# Altium PCB Urukul.PcbDoc (part 12 of 15)
Units mm, origin at the board's own origin, x right, y up, seen from the top; angles counter-clockwise.
Board outline 161.99 x 100 mm, 6 copper layers (L1, L2, L3, L4, P5, L6), stack 1.548 mm thick; 1078 components, 609 nets, 3798 pads, 2552 vias.
Unrouted connection lines stored in the file: 1.
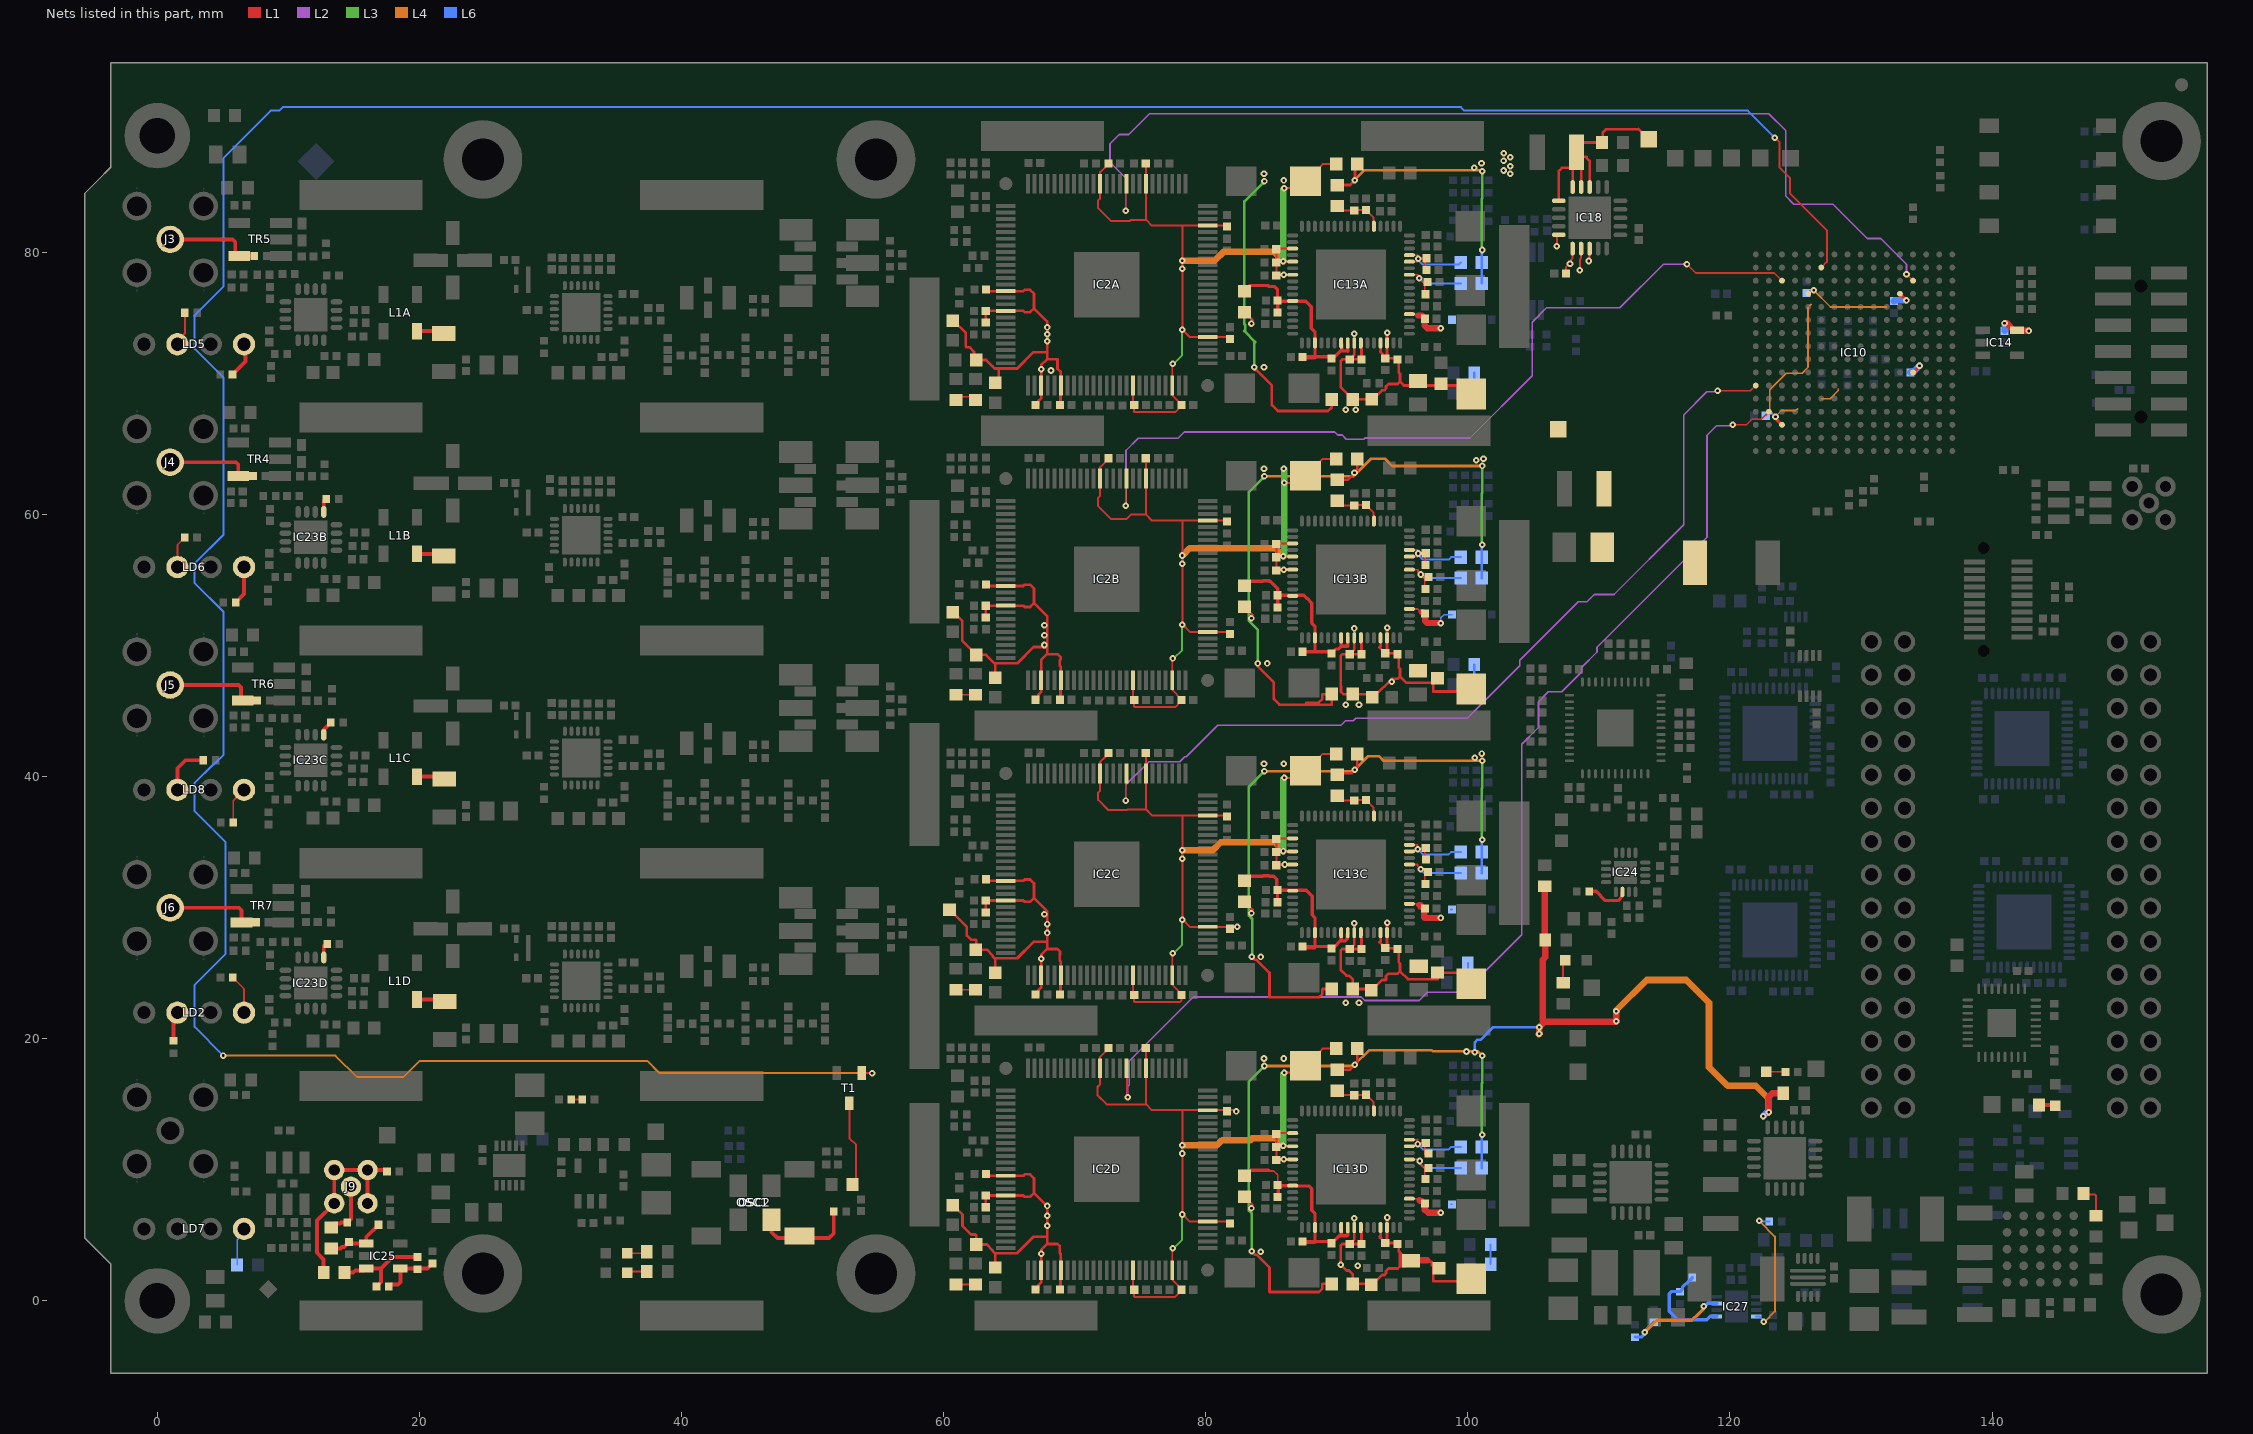
[diagram p14: the nets of this part, all layers, seen from the top]

## Via types
v1: diameter 0.5, hole 0.2, L1 to L6, tented both sides, 1964 vias
v2: diameter 0.5, hole 0.2, L1 to L6, 480 vias
v3: diameter 0.6, hole 0.3, L1 to L6, tented both sides, 52 vias
v4: diameter 0.6, hole 0.3, L1 to L6, 36 vias
v5: diameter 0.762, hole 0.508, L1 to L6, tented both sides, 20 vias

## Nets (pads, with @x,y where several pads share a name; then routed paths per layer and width w, separated by ;. In a path a pad name is that pad's centre, name@x,y a point inside that pad or via, vN(x,y) a via of type N, cw(c..) or ccw(c..) an arc to the next point about the centre after c; other vN are vias at no path point) (continued)
NetIC23B_5: IC23B.5 R138B.2 | length 1
  L1 w0.3: IC23B.5@12.698,60.199 12.698,61.072 R138B.2@12.794,61.168
NetIC23C_5: IC23C.5 R138C.2 | length 1.2
  L1 w0.298: IC23C.5@12.698,43.199 12.713,43.214 12.713,43.582 13.249,44.118 R138C.2@13.249,44.138
NetIC23D_5: IC23D.5 R138D.2 | length 1
  L1 w0.3: IC23D.5@12.698,26.199 12.698,27.072 R138D.2@12.794,27.168
NetIC24_2: IC24.2 R165.2 | length 3.3
  L1 w0.254: R165.2@109.261,31.241 109.798,31.241 110.497,30.542 111.46,30.542 111.793,30.875 IC24.2@111.793,31.196
NetIC25_1: IC25.1 R186.1 R188.2 R189.2 | length 4.7
  L1 w0.298: R186.1@13.269,3.997 13.969,3.997 14.093,4.121 14.236,4.121 14.599,4.483 R189.2@14.619,4.483 14.739,4.363 IC25.1@15.944,4.363 15.944,4.869 R188.2@16.874,5.799
NetIC25_3: IC25.3 R183.2 R184.2 R185.1 | length 7.6
  L1 w0.298: R185.1@14.294,2.153 14.944,2.153 15.114,2.324 15.804,2.324 IC25.3@15.944,2.463 17.069,2.463 ; R184.2@16.724,1.088 17.069,1.433 17.069,2.463 ; R183.2@19.844,3.34 17.946,3.34 17.069,2.463
NetIC25_4: IC25.4 R183.1 R184.1 R187.2 | length 4.7
  L1 w0.298: R184.1@17.664,1.088 17.664,1.108 17.794,1.238 18.356,1.238 18.544,1.426 IC25.4@18.544,2.463 20.614,2.463 R187.2@20.994,2.843
NetIC27_4: IC27.4 R198.2 | length 10.1
  L4 w0.152: v1(122.223,6.099) 123.42,4.902 123.42,-0.805 122.64,-1.585 v1(122.568,-1.585)
  L6 w0.152: IC27.4@121.998,-1.191 122.248,-1.191 122.568,-1.512 v1(122.568,-1.585) ; v1(122.223,6.099) 122.264,6.058 R198.2@123.003,6.058
NetIC27_5: IC27.5 R194.1 R195.2 | length 7.7
  L6 w0.254: R194.1@117.121,1.767 117.121,1.747 116.958,1.584 116.938,1.584 116.377,1.023 116.377,0.866 116.214,0.703 115.522,0.703 115.373,0.554 115.373,-0.815 116.005,-1.448 118.232,-1.448 118.488,-1.191 IC27.5@118.998,-1.191
NetIC27_7: IC27.7 R196.1 R197.2 | length 8.5
  L4 w0.254: v1(113.51,-2.386) 114.399,-1.497 117.103,-1.497 117.645,-0.954 117.967,-0.633 117.967,-0.461 v1(118.014,-0.414)
  L6 w0.254: R196.1@112.756,-2.767 113.248,-2.767 113.463,-2.552 113.463,-2.433 113.557,-2.339 113.557,-2.231 114.167,-1.622 R197.2@114.187,-1.622 ; v1(118.014,-0.414) 118.08,-0.414 118.303,-0.191 IC27.7@118.998,-0.191
NetJ3_1: J3.1 R180.1 TR5.4 | length 7.4
  L1 w0.298: J3.1@0.984,80.988 5.757,80.988 5.945,80.8 5.945,80.033 TR5.4@6.26,79.718 6.272,79.731 R180.1@7.399,79.731
NetJ4_1: J4.1 R179.1 TR4.4 | length 7.3
  L1 w0.298: J4.1@0.984,63.988 6.002,63.988 6.179,63.811 TR4.4@6.179,62.943 R179.1@7.299,62.943
NetJ5_1: J5.1 R181.1 TR6.4 | length 7.7
  L1 w0.298: J5.1@0.984,46.988 6.194,46.988 6.382,46.8 6.382,45.929 TR6.4@6.518,45.793 R181.1@7.638,45.793
NetJ6_1: J6.1 R182.1 TR7.4 | length 7.8
  L1 w0.298: J6.1@0.744,29.988 J6.1@0.984,29.988 6.233,29.988 6.421,29.8 TR7.4@6.421,28.868 7.528,28.868 R182.1@7.541,28.881
NetJ9_1: J9.1 R186.2 R191.1 | length 4.2
  L1 w0.298: R186.2@13.269,5.597 13.559,5.886 13.932,5.886 14.009,5.963 R191.1@14.499,5.963 14.774,6.238 J9.1@14.774,8.708
NetJ9_2: J9.2 R185.2 R190.1 | length 15.2
  L1 w0.298: R185.2@12.694,2.153 12.694,3.163 12.194,3.663 12.194,6.128 J9.2@13.504,7.438 J9.2@13.504,9.978 J9.2@16.044,9.978 ; J9.2@16.044,7.438 J9.2@16.044,9.978 ; R190.1@17.524,9.865 17.411,9.978 J9.2@16.044,9.978
NetL1A_1: L1A.1 R137A.2 | length 1.8
  L1 w0.3: L1A.1@19.814,73.994 21.388,73.994 R137A.2@21.544,73.838
NetL1B_1: L1B.1 R137B.2 | length 1.8
  L1 w0.3: L1B.1@19.814,56.994 21.388,56.994 R137B.2@21.544,56.838
NetL1C_1: L1C.1 R137C.2 | length 1.8
  L1 w0.3: L1C.1@19.814,39.994 21.388,39.994 R137C.2@21.544,39.838
NetL1D_1: L1D.1 R137D.2 | length 1.8
  L1 w0.3: L1D.1@19.814,22.994 21.388,22.994 R137D.2@21.544,22.838
NetL9_2: L9.2 T1.3 | length 6.5
  L1 w0.152: T1.3@52.81,15.075 52.81,12.415 53.318,11.907 53.318,9.162 L9.2@53.044,8.888
NetLD1_2: LD1.2 R5.1 | length 1.4
  L1 w0.152: LD1.2@35.949,2.243 R5.1@37.349,2.243
NetLD2_2: LD2.2 R25.2 | length 2.3
  L1 w0.3: R25.2@1.234,19.833 1.234,21.112 1.266,21.145 1.266,21.72 LD2.2@1.534,21.988
NetLD2_4: LD2.4 R26.2 | length 3
  L1 w0.127: R26.2@5.764,24.663 6.614,23.813 LD2.4@6.614,21.988
NetLD3_2: LD3.2 R33.1 | length 1.5
  L1 w0.127: LD3.2@122.774,17.478 122.782,17.47 R33.1@124.238,17.47
NetLD4_2: LD4.2 R115.1 | length 1.8
  L1 w0.152: R115.1@107.277,24.264 107.277,25.847 LD4.2@107.419,25.988
NetLD5_2: LD5.2 R27.2 | length 2.6
  L1 w0.152: LD5.2@1.534,72.988 1.534,73.246 2.105,73.816 R27.2@2.105,75.388
NetLD5_4: LD5.4 R28.2 | length 1.8
  L1 w0.3: R28.2@5.735,70.688 6.721,71.675 6.721,72.113
NetLD6_2: LD6.2 R29.2 | length 2.5
  L1 w0.127: LD6.2@1.534,55.988 1.534,57.692 R29.2@2.091,58.249
NetLD6_4: LD6.4 R30.2 | length 3
  L1 w0.3: R30.2@5.984,53.288 6.614,53.918 LD6.4@6.614,55.988
NetLD7_4: LD7.4 R143.1 | length 3
  L6 w0.127: R143.1@6.089,2.739 6.089,4.647 6.614,5.172 LD7.4@6.614,5.488
NetLD8_2: LD8.2 R43.2 | length 3.9
  L1 w0.3: LD8.2@1.534,38.988 1.534,40.638 2.145,41.249 R43.2@3.504,41.249
NetLD8_4: LD8.4 R44.2 | length 2.8
  L1 w0.127: R44.2@5.789,36.483 5.789,38.164 LD8.4@6.614,38.988
NetLD9_2: LD9.2 R139.1 | length 1.5
  L1 w0.127: LD9.2@35.869,3.638 37.244,3.638 R139.1@37.349,3.743
NetLD10_2: LD10.2 R116.1 | length 1.3
  L1 w0.152: R116.1@143.578,14.926 R116.1@143.616,14.964
  L1 w0.298: R116.1@143.578,14.926 144.786,14.926 LD10.2@144.832,14.879
NetOSC1_3: OSC1.3 OSC2.3 R117.2 | length 7.7
  L1 w0.298: OSC2.3@46.861,6.188 46.861,5.232 47.313,4.78 51.248,4.78 51.616,5.149 R117.2@51.616,6.812
NetR84_2: R84.2 R87.1 | length 2.6
  L1 w0.152: R84.2@146.982,8.195 147.062,8.116 147.843,8.116 147.932,8.027 R87.1@147.932,6.495
NetR90A_1: R90A.1 R92A.2 | length 1.5
  L1 w0.127: R92A.2@60.944,68.991 R90A.1@62.444,68.991
NetR90B_1: R90B.1 R92B.2 | length 1.5
  L1 w0.127: R92B.2@60.944,46.241 62.394,46.241 62.419,46.266 R90B.1@62.444,46.291
NetR90C_1: R90C.1 R92C.2 | length 1.5
  L1 w0.127: R92C.2@60.944,23.741 R90C.1@62.444,23.741
NetR90D_1: R90D.1 R92D.2 | length 1.3
  L1 w0.127: R92D.2@60.944,1.241 62.144,1.241 R90D.1@62.194,1.291
NetR113A_2: R113A.2 R140A.1 | length 1.5
  L6 w0.203: R113A.2@100.494,69.291 R140A.1@100.494,70.791
NetR113B_2: R113B.2 R140B.1 | length 1.5
  L6 w0.203: R113B.2@100.494,47.041 R140B.1@100.494,48.541
NetR113C_2: R113C.2 R140C.1 | length 1.5
  L6 w0.152: R113C.2@99.994,24.291 R140C.1@99.994,25.791
NetR113D_2: R113D.2 R140D.1 | length 1.5
  L6 w0.152: R113D.2@101.744,2.791 R140D.1@101.744,4.291
NetR133_1: R133.1 R135.2 | length 0.8
  L1 w0.152: R133.1@31.589,15.348 R135.2@32.42,15.348
OSC_ENn: IC10.B6 T1.1 | length 260.5
  L1 w0.152: T1.1@53.76,17.375 53.769,17.366 v1(54.537,17.366) ; v1(123.422,88.753) 123.784,88.39 123.784,86.469 124.565,85.689 124.565,84.516 127.398,81.683 127.398,79.269 IC10.B6@126.97,78.841
  L4 w0.152: v1(5.032,18.714) 13.592,18.714 15.243,17.063 18.774,17.063 20.014,18.304 37.371,18.304 38.281,17.394 54.509,17.394 v1(54.537,17.366)
  L6 w0.152: v1(5.032,18.714) 2.848,20.899 2.848,24.108 5.206,26.466 5.206,35.003 2.848,37.361 2.848,39.519 4.252,40.924 4.318,40.924 5.058,41.664 5.058,52.559 2.848,54.769 2.848,56.263 5.058,58.473 5.058,70.424 2.848,72.633 2.848,75.213 5.058,77.422 5.058,87.218 8.65,90.81 9.317,90.81 9.583,91.077 99.473,91.077 99.74,90.81 121.365,90.81 v1(123.422,88.753)
OSK0: IC2A.60 IC10.C13 | length 78.6
  L1 w0.127: v1(73.9,83.171) 73.9,85.197 IC2A.60@73.944,85.241 ; v1(133.47,78.341) IC10.C13@133.97,77.841
  L2 w0.127: v1(73.9,83.171) 73.9,85.673 72.69,86.883 72.69,88.294 73.394,88.997 74.117,88.997 75.708,90.588 122.963,90.588 124.257,89.294 124.257,84.298 124.878,83.677 127.859,83.677 130.474,81.063 131.512,81.063 133.47,79.105 v1(133.47,78.341)
OSK1: IC2B.60 IC10.C3 | length 65.7
  L1 w0.127: v1(73.9,60.671) 73.9,62.697 IC2B.60@73.944,62.741 ; v1(116.72,79.091) 117.386,78.425 123.386,78.425 IC10.C3@123.97,77.841
  L2 w0.127: v1(73.9,60.671) 73.909,60.68 73.909,64.877 74.85,65.817 77.884,65.817 78.36,66.294 89.837,66.294 90.069,66.062 90.412,66.062 90.723,65.751 92.047,65.751 92.135,65.838 100.162,65.838 104.921,70.597 104.921,74.68 106.008,75.766 111.599,75.766 114.923,79.091 v1(116.72,79.091)
  L3 w0.127: v1(73.9,60.671) v1@73.935,60.705
OSK2: IC2C.60 IC10.L1 | length 69.2
  L1 w0.127: v1(73.9,38.171) 73.9,40.197 IC2C.60@73.944,40.241 ; v1(119.053,69.433) 121.544,69.433 121.952,69.841 IC10.L1@121.97,69.841
  L2 w0.127: v1(73.9,38.171) 73.9,39.372 75.671,41.143 78.023,41.143 78.396,41.516 78.512,41.516 80.924,43.928 90.324,43.928 90.667,44.271 91.263,44.271 91.435,44.443 99.954,44.443 103.965,48.454 103.965,48.87 108.425,53.331 109.093,53.331 109.656,53.893 111.151,53.893 116.472,59.214 116.472,67.594 118.241,69.363 118.983,69.363 v1(119.053,69.433)
  L3 w0.127: v1(73.9,38.171) v1@73.935,38.205
OSK3: IC2D.60 IC10.N2 | length 89.4
  L1 w0.127: IC2D.60@73.944,17.741 73.993,17.692 73.993,15.587 v1(74.042,15.538) ; v1(120.219,66.841) 121.268,66.841 121.684,67.256 122.386,67.256 IC10.N2@122.97,67.841
  L2 w0.127: v1(74.042,15.538) 74.042,16.356 74.154,16.468 74.154,18.296 79.037,23.179 91.876,23.179 92.137,22.919 96.285,22.919 96.912,23.546 99.724,23.546 104.102,27.923 104.102,42.462 105.386,43.746 105.386,45.715 106.136,46.465 107.162,46.465 108.703,48.006 108.703,48.35 109.854,49.502 109.854,49.861 118.25,58.256 118.25,66.054 118.977,66.781 120.158,66.781 v1(120.219,66.841)
  L3 w0.127: v1@73.909,15.68 74.042,15.548 v1(74.042,15.538)
P1V8_AVDDA: C135A.2 C136A.2 C138A.2 C140A.2 IC13A.11 IC13A.19 IC13A.23 IC13A.24 L17A.1 | length 17
  L1 w0.127: C136A.2@85.463,75.407 C136A.2@85.463,75.481 ; C140A.2@85.484,76.338 C140A.2@85.484,76.466 ; C135A.2@87.434,71.888 88.334,71.888
  L1 w0.254: L17A.1@83.134,77.267 83.337,77.47 84.778,77.47 84.853,77.395 85.266,77.395 85.471,77.191 85.471,76.479 85.484,76.466 85.548,76.402 85.674,76.276 86.634,76.276 87.108,76.276 87.117,76.267 87.639,76.267 88.062,75.844 88.062,74.219 88.334,73.947 IC13A.19@88.334,73.091 88.334,72.029 ; C136A.2@85.446,75.463 85.463,75.481 85.484,75.502 C140A.2@85.484,76.338 ; C135A.2@87.394,72.029 88.334,72.029 ; IC13A.23@90.373,73 90.373,72.47 ; IC13A.24@90.834,73.091 90.834,72.453 90.754,72.533 90.754,72.542 90.681,72.47 90.373,72.47 ; 88.334,72.029 89.464,72.029 89.586,71.907 89.594,71.907 89.713,71.907 90.275,72.47 90.373,72.47
P1V8_AVDDB: C135B.2 C136B.2 C138B.2 C140B.2 IC13B.11 IC13B.19 IC13B.23 IC13B.24 L17B.1 | length 18.1
  L1 w0.127: L17B.1@82.956,54.545 83.35,54.939 84.382,54.939 ; C136B.2@85.463,52.907 85.463,53.818 C140B.2@85.484,53.838 ; IC13B.23@90.334,50.241 IC13B.23@90.334,50.591
  L1 w0.254: L17B.1@83.35,54.939 83.394,54.895 84.338,54.895 84.382,54.939 84.385,54.942 84.803,54.942 84.85,54.895 84.937,54.895 85.484,54.348 C140B.2@85.484,53.838 ; C136B.2@85.463,52.907 85.484,52.928 C140B.2@85.484,53.838 ; C135B.2@87.394,49.529 88.334,49.529 ; IC13B.23@90.334,50.241 90.334,49.953 ; IC13B.24@90.834,50.591 90.834,49.953 90.737,49.953 90.703,49.987 90.67,49.953 90.334,49.953 ; C140B.2@85.484,53.838 86.634,53.838 87.079,53.838 87.091,53.827 87.481,53.827 87.718,53.589 87.737,53.589 88.094,53.232 88.094,51.713 88.334,51.473 IC13B.19@88.334,50.591 88.334,49.529 ; 88.334,49.529 89.453,49.529 C138B.2@89.594,49.388 89.939,49.733 90.114,49.733 90.334,49.953
P1V8_AVDDC: C135C.2 C136C.2 C138C.2 C140C.2 IC13C.11 IC13C.19 IC13C.23 IC13C.24 L17C.1 | length 20.3
  L1 w0.127: L17C.1@82.956,32.045 83.35,32.439 84.382,32.439 84.806,32.439 84.828,32.439 84.859,32.409 85.196,32.409 85.484,32.121 C140C.2@85.484,31.356 ; C135C.2@87.434,26.888 88.334,26.888
  L1 w0.254: L17C.1@83.287,32.36 83.322,32.395 84.338,32.395 84.382,32.439 84.385,32.442 84.803,32.442 84.806,32.439 84.85,32.395 85.181,32.395 85.42,32.156 85.42,31.402 C140C.2@85.471,31.351 ; C136C.2@85.446,30.328 85.471,30.353 85.471,30.407 85.471,31.338 C140C.2@85.471,31.351 ; C140C.2@85.484,31.338 C140C.2@85.471,31.351 ; C135C.2@87.394,27.029 88.334,27.029 ; 90.297,27.508 90.297,27.49 90.328,27.459 ; IC13C.23@90.334,28.091 90.334,27.459 ; IC13C.24@90.881,28.067 90.87,28.055 90.805,27.991 90.805,27.61 90.654,27.459 90.334,27.459 ; C140C.2@85.471,31.351 85.471,31.369 85.484,31.356 85.493,31.347 85.522,31.318 86.634,31.318 87.681,31.318 88.138,30.861 88.138,29.439 88.334,29.243 IC13C.19@88.334,28.091 88.334,27.029 ; 88.334,27.029 89.557,27.029 89.56,27.026 89.594,27.026 89.84,27.026 90.273,27.459 90.328,27.459 ; 90.328,27.459 90.334,27.459
P1V8_AVDDD: C135D.2 C136D.2 C138D.2 C140D.2 IC13D.11 IC13D.19 IC13D.23 IC13D.24 L17D.1 | length 17
  L1 w0.127: L17D.1@82.956,9.545 L17D.1@83.35,9.939 ; 84.809,9.939 84.828,9.939 84.859,9.909 85.196,9.909 85.484,9.621 C140D.2@85.484,8.838 ; C140D.2@85.522,8.8 C140D.2@85.531,8.791 ; IC13D.11@86.634,8.791 IC13D.11@86.817,8.791 ; C135D.2@87.434,4.388 88.334,4.388 ; 88.334,4.529 88.334,4.616
  L1 w0.254: L17D.1@83.35,9.939 83.367,9.957 84.792,9.957 84.809,9.939 ; C136D.2@85.522,7.95 C140D.2@85.522,8.8 ; C140D.2@85.573,8.865 85.646,8.791 IC13D.11@86.634,8.791 ; IC13D.11@86.817,8.763 87.859,8.763 88.087,8.534 88.087,6.909 88.334,6.662 IC13D.19@88.334,5.591 88.334,4.616 ; C135D.2@87.394,4.529 88.334,4.529 89.594,4.529 89.771,4.529 90.196,4.953 90.334,4.953 IC13D.23@90.334,5.591 ; 90.334,4.953 90.78,4.953 90.83,5.004 90.83,5.587 IC13D.24@90.834,5.591
P1V8_CLK_VDDA: C30A.1 C44A.1 C72A.1 C99A.1 C107A.1 C112A.1 C115A.1 C116A.2 C117A.2 C118A.2 C119A.2 C120A.2 C127A.2 C128A.2 C133A.2 C134A.2 IC2A.3 IC2A.6 IC2A.89 IC2A.92 IC13A.25 IC13A.26 IC13A.29 IC13A.30 L16A.1 | length 58.5
  L1 w0.203: C72A.1@60.694,74.841 60.719,74.816 61.694,73.841 61.694,72.791 61.715,72.769 61.964,72.769 62.319,72.414 C99A.1@62.319,72.041 ; C99A.1@62.494,71.791 63.244,71.791 63.889,71.146 63.889,71.137 ; C116A.2@63.214,74.638 C118A.2@63.214,75.538 63.217,75.541 IC2A.92@64.744,75.541 66.082,75.541 66.185,75.437 66.603,75.437 66.898,75.732 ; C117A.2@63.244,77.163 63.366,77.041 IC2A.89@64.744,77.041 66.082,77.041 66.185,77.144 66.603,77.144 66.898,76.849 66.898,75.732 ; 63.74,71.286 63.889,71.137 ; C112A.1@64.194,70.091 64.194,71.137 ; C120A.2@67.219,68.316 67.219,68.363 67.219,68.641 67.444,68.866 IC2A.3@67.444,69.841 v1(67.444,71.088) 67.444,71.388 67.894,71.838 ; C119A.2@69.094,68.316 68.958,68.452 68.919,68.491 68.919,69.816 IC2A.6@68.944,69.841 68.944,70.851 68.948,70.855 68.694,71.108 68.694,71.838 67.894,71.838 ; v1(91.334,73.803) IC13A.25@91.334,73.091 91.334,72.188 C134A.2@90.984,71.838 ; IC13A.26@91.834,73.091 91.834,72.741 91.884,72.691 C127A.2@91.884,71.838 C134A.2@90.984,71.838 ; IC13A.29@93.334,72.741 IC13A.29@93.334,73.091 93.344,73.081 93.344,72.741 93.344,72.466 ; 93.344,72.458 93.344,72.466 ; v1(93.853,73.858) 93.834,73.839 IC13A.30@93.834,73.091 C133A.2@93.834,71.913 ; C115A.1@100.264,69.188 100.064,68.988 99.214,69.838 97.944,69.838 96.194,69.838 95.119,69.838 94.819,70.138 ; 63.889,71.137 64.194,71.137 ; 64.194,71.137 65.618,71.137 66.869,72.388 67.894,72.388 ; 66.898,75.732 67.894,74.736 v1(67.894,74.27) 67.894,73.738 v1(67.894,73.228) 67.894,72.388 ; 67.894,71.838 67.894,72.388 ; C134A.2@90.984,71.838 90.419,71.838 90.294,71.713 90.294,69.713 L16A.1@91.219,68.788 92.674,68.788 92.769,68.788 93.455,69.475 93.624,69.475 93.758,69.609 93.758,69.777 93.94,69.96 94.64,69.96 94.819,70.138 ; 93.344,72.466 93.306,72.429 93.694,72.041 C133A.2@93.694,71.913 C133A.2@93.834,71.913 ; C133A.2@93.834,71.913 94.619,71.913 94.656,71.876 94.719,71.813 94.719,70.838 94.819,70.738 94.819,70.138
  L4 w0.203: v1@91.292,73.761 v1(91.334,73.803)
  other v1: 90.694,67.993 91.444,67.993 68.194,70.988 67.894,73.738
P1V8_CLK_VDDB: C30B.1 C44B.1 C72B.1 C99B.1 C107B.1 C112B.1 C115B.1 C116B.2 C117B.2 C118B.2 C119B.2 C120B.2 C127B.2 C128B.2 C133B.2 C134B.2 IC2B.3 IC2B.6 IC2B.89 IC2B.92 IC13B.25 IC13B.26 IC13B.29 IC13B.30 L16B.1 | length 59.5
  L1 w0.203: C72B.1@60.694,52.591 60.719,52.566 61.423,51.862 61.423,50.362 C99B.1@62.494,49.291 63.235,49.291 63.889,48.637 ; C116B.2@63.214,52.138 C118B.2@63.214,53.038 63.217,53.041 IC2B.92@64.744,53.041 66.082,53.041 66.185,52.937 66.603,52.937 66.898,53.232 ; C117B.2@63.244,54.663 63.366,54.541 IC2B.89@64.744,54.541 66.082,54.541 66.185,54.644 66.603,54.644 66.898,54.349 66.898,53.232 ; C112B.1@63.944,47.591 63.944,48.582 63.889,48.637 ; C120B.2@67.219,45.816 67.219,45.863 67.219,46.239 67.444,46.464 IC2B.3@67.444,47.341 67.444,48.888 67.894,49.338 ; C119B.2@69.094,45.816 68.958,45.952 68.919,45.991 68.919,47.316 IC2B.6@68.944,47.341 68.944,48.351 68.948,48.355 68.948,48.373 68.863,48.457 68.863,48.874 68.948,48.958 68.948,49.085 68.694,49.338 67.894,49.338 ; v1(91.334,51.303) IC13B.25@91.334,50.591 91.334,49.688 C134B.2@90.984,49.338 ; IC13B.26@91.834,50.591 91.834,50.241 91.884,50.191 C127B.2@91.884,49.338 C134B.2@90.984,49.338 ; IC13B.29@93.334,50.241 IC13B.29@93.334,50.591 93.344,50.581 93.344,49.966 93.243,49.865 C133B.2@93.694,49.413 C133B.2@93.834,49.413 ; v1(93.853,51.358) 93.834,51.339 IC13B.30@93.834,50.591 C133B.2@93.834,49.413 ; C115B.1@100.264,46.688 100.064,46.488 97.369,46.488 97.369,47.168 95.289,47.168 94.819,47.638 ; 63.889,48.637 65.618,48.637 66.869,49.888 67.694,49.888 67.894,49.888 ; 66.898,53.232 67.894,52.236 67.894,51.541 67.894,50.791 67.894,50.041 67.894,49.888 ; 67.894,49.338 67.894,49.888 ; C134B.2@90.984,49.338 90.419,49.338 90.294,49.213 90.294,46.911 90.323,46.883 90.323,46.466 90.5,46.288 L16B.1@91.219,46.288 92.694,46.288 93.035,46.288 94.09,47.343 94.207,47.46 94.64,47.46 94.819,47.638 ; C133B.2@93.834,49.413 94.619,49.413 94.656,49.376 94.719,49.313 94.719,48.338 94.819,48.238 94.819,47.638
  other v1: 90.694,45.488 91.694,45.488 94.194,47.238 67.694,50.041 67.694,50.791 67.694,51.541
P1V8_CLK_VDDC: C30C.1 C44C.1 C72C.1 C99C.1 C107C.1 C112C.1 C115C.1 C116C.2 C117C.2 C118C.2 C119C.2 C120C.2 C127C.2 C128C.2 C133C.2 C134C.2 IC2C.3 IC2C.6 IC2C.89 IC2C.92 IC13C.25 IC13C.26 IC13C.29 IC13C.30 L16C.1 | length 59.8
  L1 w0.203: C99C.1@60.444,29.841 61.775,28.509 61.775,27.88 62.096,27.56 62.425,27.56 62.494,27.491 C72C.1@62.494,26.791 ; C72C.1@62.194,26.791 C72C.1@62.444,26.791 C72C.1@62.494,26.791 ; C116C.2@63.214,29.638 C118C.2@63.214,30.538 63.217,30.541 IC2C.92@64.744,30.541 66.082,30.541 66.185,30.437 66.603,30.437 66.898,30.732 ; C117C.2@63.244,32.163 63.366,32.041 IC2C.89@64.744,32.041 66.082,32.041 66.185,32.144 66.603,32.144 66.898,31.849 66.898,30.732 ; C112C.1@63.944,25.091 63.944,26.082 63.889,26.137 ; C120C.2@67.219,23.316 67.219,23.363 67.219,23.683 67.444,23.908 IC2C.3@67.444,24.841 v1(67.444,26.088) 67.444,26.388 67.894,26.838 ; C119C.2@69.094,23.316 68.958,23.452 68.919,23.491 68.919,24.816 IC2C.6@68.944,24.841 68.944,25.851 68.948,25.855 68.948,25.868 68.863,25.952 68.863,26.37 68.877,26.383 68.877,26.655 68.694,26.838 67.894,26.838 ; v1(91.334,28.803) IC13C.25@91.334,28.091 91.334,27.188 C134C.2@90.984,26.838 ; IC13C.26@91.834,28.091 91.834,27.741 91.884,27.691 C127C.2@91.884,26.838 C134C.2@90.984,26.838 ; IC13C.29@93.334,27.741 IC13C.29@93.334,28.091 93.344,28.081 93.344,27.466 ; 93.344,27.458 93.344,27.466 ; v1(93.853,28.858) 93.834,28.839 IC13C.30@93.834,28.091 C133C.2@93.834,26.913 ; C115C.1@100.264,24.188 100.381,24.305 99.647,25.039 98.192,25.039 97.949,24.796 97.694,24.541 95.416,24.541 94.819,25.138 ; C72C.1@62.494,26.791 63.291,26.791 63.74,26.342 63.74,26.286 63.889,26.137 ; 63.889,26.137 65.618,26.137 66.869,27.388 67.894,27.388 ; 66.898,30.732 67.894,29.736 67.894,29.488 v1(67.894,28.749) v1(67.894,28.068) 67.894,27.388 ; 67.894,26.838 67.894,27.388 ; C134C.2@90.984,26.838 90.419,26.838 90.294,26.713 90.294,25.261 90.746,24.81 90.923,24.81 91.219,24.513 L16C.1@91.219,23.788 92.644,23.788 92.769,23.788 93.455,24.475 93.758,24.475 93.758,24.777 93.94,24.96 94.64,24.96 94.819,25.138 ; 93.344,27.466 93.243,27.365 C133C.2@93.694,26.913 C133C.2@93.834,26.913 ; C133C.2@93.834,26.913 94.619,26.913 94.656,26.876 94.719,26.813 94.719,25.838 94.819,25.738 94.819,25.138
  other v1: 90.694,22.738 91.694,22.738 67.694,29.488
P1V8_CLK_VDDD: C30D.1 C44D.1 C72D.1 C99D.1 C107D.1 C112D.1 C115D.1 C116D.2 C117D.2 C118D.2 C119D.2 C120D.2 C127D.2 C128D.2 C133D.2 C134D.2 IC2D.3 IC2D.6 IC2D.89 IC2D.92 IC13D.25 IC13D.26 IC13D.29 IC13D.30 L16D.1 | length 61.2
  L1 w0.203: C72D.1@60.694,7.341 60.719,7.316 61.444,6.591 61.444,5.711 62.096,5.06 62.425,5.06 62.494,4.991 C99D.1@62.494,4.291 63.291,4.291 63.74,3.842 63.74,3.786 63.889,3.637 ; C116D.2@63.214,7.138 C118D.2@63.214,8.038 63.217,8.041 IC2D.92@64.744,8.041 66.082,8.041 66.185,7.937 66.603,7.937 66.898,8.232 ; C117D.2@63.244,9.663 63.366,9.541 IC2D.89@64.744,9.541 66.082,9.541 66.185,9.644 66.603,9.644 66.898,9.349 66.898,8.232 ; C112D.1@63.944,2.591 63.944,3.582 63.889,3.637 ; C120D.2@67.219,0.816 67.219,0.863 67.219,1.179 67.444,1.404 IC2D.3@67.444,2.341 v1(67.444,3.588) 67.444,3.888 67.894,4.338 ; C119D.2@69.094,0.816 68.958,0.952 68.919,0.991 68.919,2.316 IC2D.6@68.944,2.341 68.944,3.351 68.948,3.355 68.948,3.567 68.863,3.651 68.863,4.169 68.694,4.338 67.894,4.338 ; v1(91.334,6.303) IC13D.25@91.334,5.591 91.334,4.688 C134D.2@90.984,4.338 ; IC13D.26@91.834,5.591 91.834,5.241 91.884,5.191 C127D.2@91.884,4.338 C134D.2@90.984,4.338 ; IC13D.29@93.334,5.241 IC13D.29@93.334,5.591 93.344,5.581 93.344,4.966 ; 93.37,4.775 93.344,4.802 93.344,4.966 ; v1(93.853,6.358) 93.834,6.339 IC13D.30@93.834,5.591 C133D.2@93.834,4.413 ; 94.81,3.729 94.81,3.689 ; C107D.1@95.694,3.091 95.658,3.055 95.241,2.638 94.974,2.638 94.974,3.054 94.974,3.525 94.81,3.689 ; 96.894,3.091 97.013,2.972 97.229,2.972 97.25,2.951 97.25,2.735 97.369,2.616 97.369,2.497 97.369,1.488 100.064,1.488 C115D.1@100.264,1.688 ; 63.889,3.637 65.618,3.637 66.869,4.888 67.894,4.888 ; 66.898,8.232 v1(67.894,7.236) v1(67.894,6.488) v1(67.894,5.738) 67.894,4.888 ; 67.894,4.338 67.894,4.888 ; C134D.2@90.984,4.338 90.419,4.338 90.294,4.213 v1(90.294,2.761) 90.746,2.31 90.923,2.31 91.219,2.013 L16D.1@91.219,1.288 92.644,1.288 92.769,1.288 93.455,1.975 93.624,1.975 93.758,2.109 93.758,2.277 93.94,2.46 94.64,2.46 94.81,2.629 94.81,3.689 ; 93.344,4.966 93.282,4.904 93.282,4.825 C133D.2@93.694,4.413 C133D.2@93.834,4.413 ; C133D.2@93.834,4.413 94.619,4.413 94.656,4.376 94.719,4.313 94.719,3.78 94.81,3.689
  L1 w0.5: C107D.1@95.694,3.091 96.894,3.091
  other v1: 91.596,2.687
P1V8_DACCLKA: C143A.2 C144A.2 IC13A.44 IC13A.45 L19A.1 | length 6.9
  L1 w0.127: IC13A.44@95.534,79.291 96.171,79.291 96.171,79.484 v1(96.215,79.527) 96.226,79.538 96.784,79.538 96.714,79.468 96.714,78.664 C143A.2@96.714,78.638 ; IC13A.45@95.534,79.791 96.164,79.791
  L1 w0.152: 96.164,79.791 96.215,79.74 v1(96.215,79.527)
  L6 w0.152: v1(96.215,79.527) 96.215,79.41 96.565,79.06 99.286,79.06 L19A.1@99.464,79.238
P1V8_DACCLKB: C143B.2 C144B.2 IC13B.44 IC13B.45 L19B.1 | length 6.9
  L1 w0.127: IC13B.44@95.534,56.791 96.171,56.791 96.171,56.979 v1(96.215,57.023) 96.23,57.038 C144B.2@96.784,57.038 96.714,56.968 96.714,56.158 C143B.2@96.714,56.138 ; IC13B.45@95.534,57.291 96.164,57.291
  L1 w0.152: 96.164,57.291 96.215,57.24 v1(96.215,57.023)
  L6 w0.152: v1(96.215,57.023) 96.215,56.91 96.565,56.56 98.542,56.56 98.72,56.738 L19B.1@99.464,56.738
P1V8_DACCLKC: C143C.2 C144C.2 IC13C.44 IC13C.45 L19C.1 | length 6.9
  L1 w0.127: IC13C.44@95.534,34.291 96.164,34.291 96.171,34.291 96.171,34.453 v1(96.164,34.461) 96.241,34.538 C144C.2@96.784,34.538 96.714,34.468 96.714,33.669 C143C.2@96.714,33.638 ; IC13C.45@95.534,34.791 96.164,34.791
  L1 w0.152: v1(96.164,34.461) 96.164,34.791
  L6 w0.152: v1(96.164,34.461) 96.565,34.06 98.542,34.06 98.72,34.238 L19C.1@99.464,34.238
P1V8_DACCLKD: C143D.2 C144D.2 IC13D.44 IC13D.45 L19D.1 | length 6.9
  L1 w0.127: IC13D.44@95.534,11.791 96.164,11.791 96.171,11.791 96.171,11.953 v1(96.164,11.961) 96.241,12.038 C144D.2@96.784,12.038 96.714,11.968 96.714,11.238 C143D.2@96.714,11.138 ; IC13D.45@95.534,12.291 96.164,12.291
  L1 w0.152: v1(96.164,11.961) 96.164,12.291
  L6 w0.152: v1(96.164,11.961) 96.565,11.56 98.542,11.56 98.72,11.738 L19D.1@99.464,11.738
P1V8_DACDECA: C149A.2 C150A.2 IC13A.53 L21A.1 | length 3.8
  L1 w0.152: L21A.1@90.034,83.538 90.384,83.188 C149A.2@91.334,83.188 91.366,83.22 C150A.2@92.235,83.22 C150A.2@92.235,83.22 92.819,82.638 92.819,82.006 IC13A.53@92.834,81.991
P1V8_DACDECB: C149B.2 C150B.2 IC13B.53 L21B.1 | length 3.8
  L1 w0.152: L21B.1@90.034,61.038 90.384,60.688 C149B.2@91.334,60.688 91.366,60.72 C150B.2@92.235,60.72 C150B.2@92.235,60.72 92.819,60.138 92.819,59.506 IC13B.53@92.834,59.491
P1V8_DACDECC: C149C.2 C150C.2 IC13C.53 L21C.1 | length 3.8
  L1 w0.152: L21C.1@90.034,38.538 90.384,38.188 C149C.2@91.334,38.188 91.366,38.22 C150C.2@92.235,38.22 C150C.2@92.235,38.22 92.819,37.638 92.819,37.006 IC13C.53@92.834,36.991
P1V8_DACDECD: C149D.2 C150D.2 IC13D.53 L21D.1 | length 3.8
  L1 w0.152: L21D.1@90.034,16.038 90.384,15.688 C149D.2@91.334,15.688 91.366,15.72 C150D.2@92.235,15.72 C150D.2@92.235,15.72 92.819,15.138 92.819,14.506 IC13D.53@92.834,14.491
P1V8_DRVA: C146A.2 C147A.2 C148A.2 IC13A.36 IC13A.42 L20A.1 R93A.2 | length 8.8
  L1 w0.127: IC13A.36@95.534,75.291 96.171,75.291 96.274,75.188 96.274,75.184 ; IC13A.42@95.534,78.291 96.171,78.291 96.215,78.247 v1@96.215,78.201 ; v1@96.367,77.915 96.544,77.738 96.714,77.738 C146A.2@96.714,76.838 ; C147A.2@96.719,74.93 C147A.2@96.719,74.938 C147A.2@96.784,74.938
  L1 w0.483: 96.209,75.184 96.274,75.184 96.473,75.184 C147A.2@96.719,74.938 ; C147A.2@96.698,74.93 96.698,74.422 96.906,74.213 v1(97.942,74.213)
  L6 w0.127: v1(97.942,74.213) v1@98.147,74.213
  L6 w0.152: v1@96.393,77.922 96.676,77.638 L20A.1@99.464,77.638
  other v1: 96.291,78.029
P1V8_DRVB: C146B.2 C147B.2 C148B.2 IC13B.36 IC13B.42 L20B.1 R93B.2 | length 9.9
  L1 w0.127: IC13B.36@95.534,52.791 96.171,52.791 96.274,52.688 ; IC13B.42@95.534,55.791 96.171,55.791 96.199,55.763 96.199,55.584 96.369,55.584 96.462,55.491 96.714,55.238 C146B.2@96.714,54.338
  L1 w0.483: C147B.2@96.469,52.553 96.622,52.553 96.728,52.447 96.749,52.426 96.749,51.867 96.902,51.713 v1(97.942,51.713)
  L6 w0.127: v1(97.942,51.713) 97.942,52.12 98.182,52.36 R93B.2@98.794,52.36
  L6 w0.152: v1(96.393,55.422) 96.676,55.138 L20B.1@99.464,55.138
P1V8_DRVC: C146C.2 C147C.2 C148C.2 IC13C.36 IC13C.42 L20C.1 R93C.2 | length 9.8
  L1 w0.127: IC13C.36@95.534,30.291 96.171,30.291 96.264,30.198 ; IC13C.42@95.534,33.291 96.171,33.291 96.171,33.143 v1(96.393,32.922) C148C.2@96.723,32.922 ; 96.274,29.938 C147C.2@96.63,29.938 ; C146C.2@96.714,31.838 96.714,32.568 96.723,32.56 96.723,32.729 C148C.2@96.723,32.922 ; C148C.2@96.947,32.775 96.8,32.922 C148C.2@96.723,32.922
  L1 w0.483: 96.266,30.201 96.368,30.201 96.63,29.938 96.672,29.896 96.672,29.261 96.72,29.213 v1(97.942,29.213)
  L6 w0.127: v1(97.942,29.213) v1@98.044,29.213 ; R93C.2@98.691,29.86 R93C.2@98.794,29.86
  L6 w0.152: v1(96.393,32.922) 96.676,32.638 L20C.1@99.464,32.638
P1V8_DRVD: C146D.2 C147D.2 C148D.2 IC13D.36 IC13D.42 L20D.1 R93D.2 | length 8.6
  L1 w0.127: IC13D.36@95.534,7.791 96.171,7.791 96.274,7.688 96.274,7.671 ; IC13D.42@95.534,10.791 96.171,10.791 96.215,10.747 v1@96.215,10.701 ; 96.367,10.415 96.544,10.238 96.714,10.238 96.714,10.138 C146D.2@96.714,9.338 ; C147D.2@96.719,7.438 C147D.2@96.784,7.438
  L1 w0.483: 96.317,7.671 96.368,7.62 96.495,7.62 96.698,7.417 96.723,7.391 96.723,6.928 96.755,6.928 96.969,6.713 v1(97.942,6.713)
  L6 w0.127: v1(97.942,6.713) v1@98.044,6.713 ; R93D.2@98.691,7.36 R93D.2@98.794,7.36
  L6 w0.152: 96.393,10.422 96.676,10.138 L20D.1@99.464,10.138
  other v1: 96.342,10.668
P1V8_DVDDA: C43A.2 C51A.2 C52A.2 C53A.2 C82A.2 C83A.2 C84A.1 C151A.2 C153A.2 C154A.2 IC2A.17 IC2A.23 IC2A.30 IC2A.47 IC2A.57 IC2A.64 IC13A.3 IC13A.5 IC13A.7 L22A.1 | length 67
  L1 w0.152: C43A.2@72.569,86.788 72.569,86.716 72.348,86.495 72.318,86.495 71.944,86.121 IC2A.64@71.944,85.241 71.944,84.11 71.767,83.934 71.767,83.403 72.76,82.41 74.204,82.41 74.282,82.488 75.444,82.488 ; IC2A.17@74.444,69.841 74.444,68.441 C83A.2@74.544,68.341 74.544,67.831 74.572,67.803 77.683,67.803 78.144,68.263 C82A.2@78.144,68.341 78.144,68.413 77.444,69.113 IC2A.23@77.444,69.841 77.444,71.488 v1(77.469,71.513) ; C51A.2@75.444,86.741 IC2A.57@75.444,85.241 75.444,82.488 ; v1@78.219,74.113 v1(78.219,78.738) v1(78.219,79.37) 78.219,81.991 78.269,82.041 ; v1@78.226,74.106 78.791,73.541 IC2A.30@80.144,73.541 C53A.2@81.844,73.541 ; C52A.2@81.585,82.041 IC2A.47@80.144,82.041 78.269,82.041 ; v1(86.004,84.907) 87.083,84.907 C84A.1@87.614,85.438 88.914,86.738 L22A.1@89.964,86.738 ; IC13A.7@86.634,78.291 v1(85.944,78.291) 85.437,78.291 C154A.2@85.384,78.238 C151A.2@85.384,79.238 ; IC13A.5@86.634,79.291 85.437,79.291 C151A.2@85.384,79.238 ; IC13A.3@86.634,80.291 85.437,80.291 C153A.2@85.384,80.238 C151A.2@85.384,79.238 ; 75.444,82.488 75.891,82.041 78.269,82.041
  L3 w0.152: v1(77.469,71.513) 77.563,71.513 78.206,72.156 v1(78.206,74.086)
  L3 w0.5: v1(85.928,79.319) 85.928,84.831 v1(86.004,84.907)
  L4 w0.5: v1(78.219,79.37) 80.694,79.37 81.383,80.058 85.188,80.058 v1(85.928,79.319)
  other v1: 85.944,85.488
P1V8_DVDDB: C43B.2 C51B.2 C52B.2 C53B.2 C82B.2 C83B.2 C84B.1 C151B.2 C153B.2 C154B.2 IC2B.17 IC2B.23 IC2B.30 IC2B.47 IC2B.57 IC2B.64 IC13B.3 IC13B.5 IC13B.7 L22B.1 | length 68.1
  L1 w0.152: C43B.2@72.569,64.288 72.569,64.216 72.348,63.995 72.318,63.995 71.944,63.621 IC2B.64@71.944,62.741 71.944,61.423 71.767,61.246 71.767,60.653 72.782,59.638 73.938,59.638 74.288,59.988 75.444,59.988 ; IC2B.17@74.444,47.341 74.444,45.941 C83B.2@74.544,45.841 74.544,45.331 74.572,45.303 77.662,45.303 78.144,45.784 C82B.2@78.144,45.841 78.144,45.913 77.444,46.613 IC2B.23@77.444,47.341 77.444,48.988 v1(77.469,49.013) ; 75.444,63.941 IC2B.57@75.444,62.741 75.444,59.988 ; v1@78.219,51.613 78.219,56.238 v1(78.219,56.87) 78.219,59.491 78.269,59.541 ; v1@78.226,51.606 78.791,51.041 IC2B.30@80.144,51.041 81.305,51.041 C53B.2@81.844,51.041 ; C52B.2@81.619,59.541 81.204,59.541 IC2B.47@80.144,59.541 78.269,59.541 ; v1(86.004,62.407) 87.083,62.407 C84B.1@87.614,62.938 88.914,64.238 L22B.1@89.964,64.238 ; IC13B.7@86.634,55.791 v1(85.944,55.791) 85.437,55.791 C154B.2@85.384,55.738 C151B.2@85.384,56.738 ; IC13B.5@86.634,56.791 85.437,56.791 C151B.2@85.384,56.738 ; IC13B.3@86.634,57.791 85.437,57.791 C153B.2@85.384,57.738 C151B.2@85.384,56.738 ; 75.444,59.988 75.891,59.541 78.269,59.541
  L3 w0.152: v1(77.469,49.013) 77.563,49.013 78.206,49.656 v1(78.206,51.586)
  L3 w0.5: v1(85.928,56.819) 86.004,56.895 v1(86.004,62.407) v1@86.004,63.488
  L4 w0.5: v1(78.219,56.87) 78.765,57.415 85.331,57.415 v1(85.928,56.819)
  other v1: 78.194,56.238 85.944,63.488
P1V8_DVDDC: C43C.2 C51C.2 C52C.2 C53C.2 C82C.2 C83C.2 C84C.1 C151C.2 C153C.2 C154C.2 IC2C.17 IC2C.23 IC2C.30 IC2C.47 IC2C.57 IC2C.64 IC13C.3 IC13C.5 IC13C.7 L22C.1 | length 67.5
  L1 w0.152: C43C.2@72.569,41.788 72.569,41.716 72.348,41.495 72.318,41.495 71.944,41.121 IC2C.64@71.944,40.241 71.944,38.923 71.789,38.768 71.789,38.226 72.58,37.436 73.986,37.436 74.038,37.488 75.444,37.488 ; IC2C.17@74.444,24.841 74.444,23.441 C83C.2@74.544,23.341 74.544,22.831 74.572,22.803 78.048,22.803 78.144,22.899 C82C.2@78.144,23.341 78.144,23.413 77.444,24.113 IC2C.23@77.444,24.841 77.444,26.488 v1(77.469,26.513) ; 75.444,41.441 IC2C.57@75.444,40.241 75.444,37.488 ; v1@78.219,29.113 v1(78.219,33.738) v1(78.219,34.37) 78.219,36.991 78.269,37.041 ; v1@78.226,29.106 78.791,28.541 IC2C.30@80.144,28.541 81.28,28.541 81.844,28.541 82.194,28.541 v1(82.416,28.541) ; C52C.2@81.619,37.041 81.071,37.041 IC2C.47@80.144,37.041 78.269,37.041 ; v1(86.004,39.907) 87.083,39.907 88.914,41.738 L22C.1@89.964,41.738 ; IC13C.7@86.634,33.291 v1(86.035,33.291) 85.437,33.291 C154C.2@85.384,33.238 C151C.2@85.384,34.238 ; IC13C.5@86.634,34.291 85.437,34.291 C151C.2@85.384,34.238 ; IC13C.3@86.634,35.291 85.437,35.291 C153C.2@85.384,35.238 C151C.2@85.384,34.238 ; 75.444,37.488 75.891,37.041 78.269,37.041
  L3 w0.152: v1(77.469,26.513) 77.563,26.513 78.206,27.156 v1(78.206,29.086)
  L3 w0.5: v1(85.928,34.319) 85.928,39.831 v1(86.004,39.907)
  L4 w0.5: v1(78.219,34.37) 80.525,34.37 81.144,34.988 85.258,34.988 v1(85.928,34.319)
  other v1: 85.944,40.988
P1V8_DVDDD: C43D.2 C51D.2 C52D.2 C53D.2 C82D.2 C83D.2 C84D.1 C151D.2 C153D.2 C154D.2 IC2D.17 IC2D.23 IC2D.30 IC2D.47 IC2D.57 IC2D.64 IC13D.3 IC13D.5 IC13D.7 L22D.1 | length 67.6
  L1 w0.152: C43D.2@72.569,19.288 72.569,19.216 72.348,18.995 72.318,18.995 71.944,18.621 71.944,16.517 71.739,16.312 71.739,15.688 72.439,14.988 75.444,14.988 ; IC2D.17@74.444,2.341 74.444,0.941 C83D.2@74.544,0.841 74.544,0.331 74.572,0.303 77.671,0.303 78.144,0.776 C82D.2@78.144,0.841 78.144,0.913 77.444,1.613 IC2D.23@77.444,2.341 77.444,3.988 v1(77.469,4.013) ; 75.444,18.941 IC2D.57@75.444,17.741 75.444,14.988 ; v1@78.219,6.613 v1(78.219,11.238) v1(78.219,11.87) 78.219,14.491 78.269,14.541 ; v1@78.226,6.606 78.791,6.041 IC2D.30@80.144,6.041 81.255,6.041 C53D.2@81.89,6.041 ; v1(82.331,14.447) 82.331,14.534 82.324,14.541 81.619,14.541 81.128,14.541 IC2D.47@80.144,14.541 78.269,14.541 ; v1(86.004,17.407) 87.083,17.407 C84D.1@87.614,17.938 88.914,19.238 L22D.1@89.964,19.238 ; IC13D.7@86.634,10.791 v1(85.944,10.791) 85.437,10.791 C154D.2@85.384,10.738 C151D.2@85.384,11.738 ; IC13D.5@86.634,11.791 85.437,11.791 C151D.2@85.384,11.738 ; IC13D.3@86.634,12.791 85.437,12.791 C153D.2@85.384,12.738 C151D.2@85.384,11.738 ; 75.444,14.988 75.891,14.541 78.269,14.541
  L3 w0.152: v1(77.469,4.013) 77.563,4.013 78.206,4.656 v1(78.206,6.586)
  L3 w0.5: v1(85.928,11.819) 85.928,17.331 v1(86.004,17.407)
  L4 w0.5: v1(78.219,11.87) 80.853,11.87 81.249,12.265 81.839,12.265 81.863,12.241 83.385,12.241 83.559,12.415 85.331,12.415 v1(85.928,11.819)
  other v1: 85.944,18.488
P1V8A: C169.2 IC18.1 IC18.18 IC18.19 IC18.20 L16A.2 L16B.2 L16C.2 L16D.2 L17A.2 L17B.2 L17C.2 L17D.2 L19A.2 L19B.2 L19C.2 L19D.2 L20A.2 L20B.2 L20C.2 L20D.2 L21A.2 L21B.2 L21C.2 L21D.2 L22A.2 L22B.2 L22C.2 L22D.2 R129.2 R150.1 R151.1 R164.1 TP10.1 | length 274.9
  L1 w0.203: L17D.2@82.905,7.971 83.566,7.31 ; L17C.2@82.956,30.445 83.572,29.829 ; L17B.2@82.956,52.945 83.572,52.329 ; L17A.2@82.956,75.445 83.572,74.829 ; 83.439,29.947 83.489,29.896 v1(83.489,29.569) ; v1(83.515,3.767) 83.762,3.52 83.869,3.52 84.861,2.528 84.861,0.668 88.639,0.668 88.892,0.922 88.892,1.288 ; v1(83.515,26.267) 83.762,26.02 83.869,26.02 84.861,25.028 84.861,23.168 88.639,23.168 88.892,23.422 88.892,23.741 88.939,23.788 L16C.2@89.619,23.788 ; v1(83.694,71.238) 83.694,71.088 83.762,71.02 83.869,71.02 85.039,69.85 85.039,68.346 85.496,67.888 85.496,67.894 89.332,67.894 89.619,68.181 L16A.2@89.619,68.788 ; v1@83.869,48.52 85.194,47.195 85.194,45.918 85.621,45.491 89.619,45.491 L16B.2@89.619,46.288 88.892,46.288 88.892,45.922 88.614,45.644 87.681,45.644 ; v1@83.874,48.632 v1(83.966,48.632) ; 88.893,1.288 L16D.2@89.619,1.288 ; L21D.2@90.034,17.638 91.019,17.638 v1@91.38,17.999 ; L21C.2@90.034,40.138 90.147,40.251 91.132,40.251 v1@91.38,40.499 ; L21B.2@90.034,62.638 90.83,62.638 91.192,63 v1@91.38,63 ; L21A.2@90.034,85.138 91.019,85.138 v1@91.38,85.499 ; v1@91.386,85.709 L22A.2@91.386,86.764 ; 91.564,18.183 L22D.2@91.564,19.238 ; 91.564,40.683 L22C.2@91.564,41.738 ; v1@91.564,63.183 L22B.2@91.564,64.238 ; IC18.1@106.944,83.938 106.944,86.225 107.172,86.453 C169.2@107.994,86.453 ; IC18.20@107.994,84.988 C169.2@107.994,86.453 ; IC18.19@108.644,84.988 C169.2@108.644,87.288 ; IC18.18@109.294,84.988 109.294,86.988 109.069,87.213 109.069,87.288 C169.2@108.644,87.288 ; 113.018,89.415 113.044,89.388 ; TP10.1@113.794,88.638 113.044,89.388 ; C169.2@107.994,86.453 108.294,86.753 C169.2@108.294,87.638 ; C169.2@108.294,87.638 C169.2@108.644,87.288 ; C169.2@108.294,87.638 108.294,88.238 108.444,88.388 R129.2@110.244,88.388 110.294,88.438 110.294,89.138 110.544,89.388 113.044,89.388
  L1 w0.5: v1(105.439,20.365) v1(105.439,20.873) 105.87,21.305 ; R151.1@105.87,31.63 105.87,27.566 R164.1@105.909,27.528 105.909,26.212 105.726,26.03 105.726,21.45 105.87,21.305 ; v1(111.331,22.093) v1(111.331,21.331) 111.306,21.305 105.87,21.305 ; v1(122.952,14.384) 122.951,14.385 122.951,15.541 123.247,15.837 R150.1@124.07,15.837
  L3 w0.203: v1(83.515,3.767) 83.515,6.663 83.29,6.887 83.29,16.725 v1(84.48,17.915) ; v1(83.515,26.267) 83.549,26.302 83.549,29.128 83.29,29.387 83.29,39.225 v1(84.48,40.415) ; v1(83.694,71.238) 83.694,73.076 83.775,73.157 82.944,73.988 82.944,73.997 83.002,74.056 83.002,74.473 82.944,74.531 82.944,83.879 v1(84.48,85.415) ; v1(83.966,48.632) 83.966,51.211 83.29,51.887 83.29,61.725 v1(84.48,62.915) ; v1(101.092,12.682) 101.071,12.703 101.071,16.599 101.092,16.62 v1(101.092,18.702) ; v1(101.092,35.182) 101.071,35.203 101.071,39.099 101.092,39.12 v1(101.092,41.202) ; v1(101.092,57.682) 101.071,57.703 101.071,61.599 101.092,61.62 v1(101.092,63.702) ; v1(101.092,80.182) 101.071,80.203 101.071,84.099 101.092,84.12 v1(101.092,86.202)
  L4 w0.203: v1(84.48,17.915) 91.262,17.915 v1(91.363,18.016) 92.464,19.117 97.255,19.117 97.322,19.05 100.744,19.05 v1(101.092,18.702) ; v1(84.48,40.415) 91.262,40.415 v1(91.363,40.516) 92.4,41.553 93.232,41.553 93.584,41.202 v1(101.092,41.202) ; v1(84.48,62.915) 91.262,62.915 91.352,63.005 v1(91.352,63.184) 91.531,63.184 92.599,64.252 93.672,64.252 94.223,63.702 v1(101.092,63.702) ; v1@91.262,85.415 v1(91.363,85.516) 92.118,86.271 101.023,86.271 v1(101.092,86.202)
  L4 w0.5: v1@105.413,20.34 v1(105.439,20.365) ; v1(111.331,22.093) 111.331,22.169 113.643,24.48 116.662,24.48 118.399,22.743 118.399,17.819 119.815,16.403 121.974,16.403 122.952,15.425 v1(122.952,14.384)
  L6 w0.203: v1(100.533,18.974) 100.533,19.727 100.714,19.908 100.968,19.908 101.933,20.873 v1(105.439,20.873) ; L20D.2@101.064,10.138 L19D.2@101.064,11.738 101.064,12.655 v1(101.092,12.682) ; L20C.2@101.064,32.638 L19C.2@101.064,34.238 101.064,35.155 v1(101.092,35.182) ; L20B.2@101.064,55.138 L19B.2@101.064,56.738 101.064,57.655 v1(101.092,57.682) ; L20A.2@101.064,77.638 L19A.2@101.064,79.238 101.064,80.155 v1(101.092,80.182)
  L6 w0.5: v1(122.533,14.092) 122.825,14.384 v1(122.952,14.384)
  other v1: 84.194,3.738 83.489,7.069 84.444,18.488 99.898,19.025 84.194,26.238 84.444,40.988 100.533,41.427 101.067,41.758 84.694,48.632 83.489,52.069 84.444,63.488 100.635,64.135 101.194,64.238 84.444,71.238 83.489,74.569 84.444,85.988 103.223,85.999 102.723,86.249 100.482,86.462 103.226,86.563 101.041,86.792 102.723,86.999 103.223,87.249 102.731,87.568
P1V8D: C152.2 C198.2 C199.2 C200.2 C201.2 IC10.D5 IC10.D12 IC10.K13 IC10.P3 IC14.5 | length 28.9
  L1 w0.254: v1(123.474,67.47) 123.474,67.336 IC10.P3@123.97,66.841 ; IC10.D5@125.97,76.841 126.242,77.113 v1(126.391,77.113) ; IC10.D12@132.97,76.841 v1@133.468,76.342 ; IC10.K13@133.97,70.847 v1(134.464,71.341)
  L1 w0.5: v1(133.468,76.332) v1@133.468,76.342 ; IC10.K13@133.97,70.841 IC10.K13@133.97,70.847 ; v1(140.953,74.603) 141.103,74.603 141.653,74.053 IC14.5@141.903,74.053 141.953,74.003 v1(142.799,74.003)
  L4 w0.127: 125.17,68.08 125.021,67.932 123.936,67.932 v1(123.474,67.47) 123.034,67.91 123.034,69.526 124.287,70.779 125.513,70.779 125.96,71.226 125.96,75.789 126.208,76.037 ; v1(126.391,77.113) 127.673,75.831 131.96,75.831 ; 126.926,68.841 127.643,68.841 128.269,69.467 128.269,69.592
  L6 w0.127: C152.2@122.735,67.538 122.887,67.69 123.18,67.69 123.422,67.448 123.422,67.417 v1(123.474,67.47)
  L6 w0.5: C200.2@132.515,76.284 132.563,76.332 v1(133.468,76.332) ; C199.2@133.778,70.84 133.838,70.9 134.023,70.9 v1(134.464,71.341) ; C201.2@140.953,74.003 v1(140.953,74.603)
P2V1: C76.1 C163.2 C167.1 IC18.5 IC18.6 IC18.7 IC18.8 L3.2 TP11.1 | length 5.7
  L1 w0.152: v1(106.794,80.463) 106.794,81.188 IC18.5@106.944,81.338 ; C167.1@107.494,78.388 107.494,78.898 107.734,79.138 v1(107.794,79.138) 107.794,79.338 107.994,79.538 IC18.6@107.994,80.288 ; v1(108.544,78.638) 108.544,79.46 108.644,79.56 IC18.7@108.644,80.288 ; v1@109.148,79.413 109.294,79.56 IC18.8@109.294,80.288
  other v1: 109.22,79.341